# Altium PCB PCB1.PcbDoc
Units mil, origin at the board's own origin, x right, y up, seen from the top; angles counter-clockwise.
Board outline 3937.01 x 3937.01 mil, 2 copper layers (Top Layer, Bottom Layer); 40 components, 51 nets, 142 pads, 6 vias.
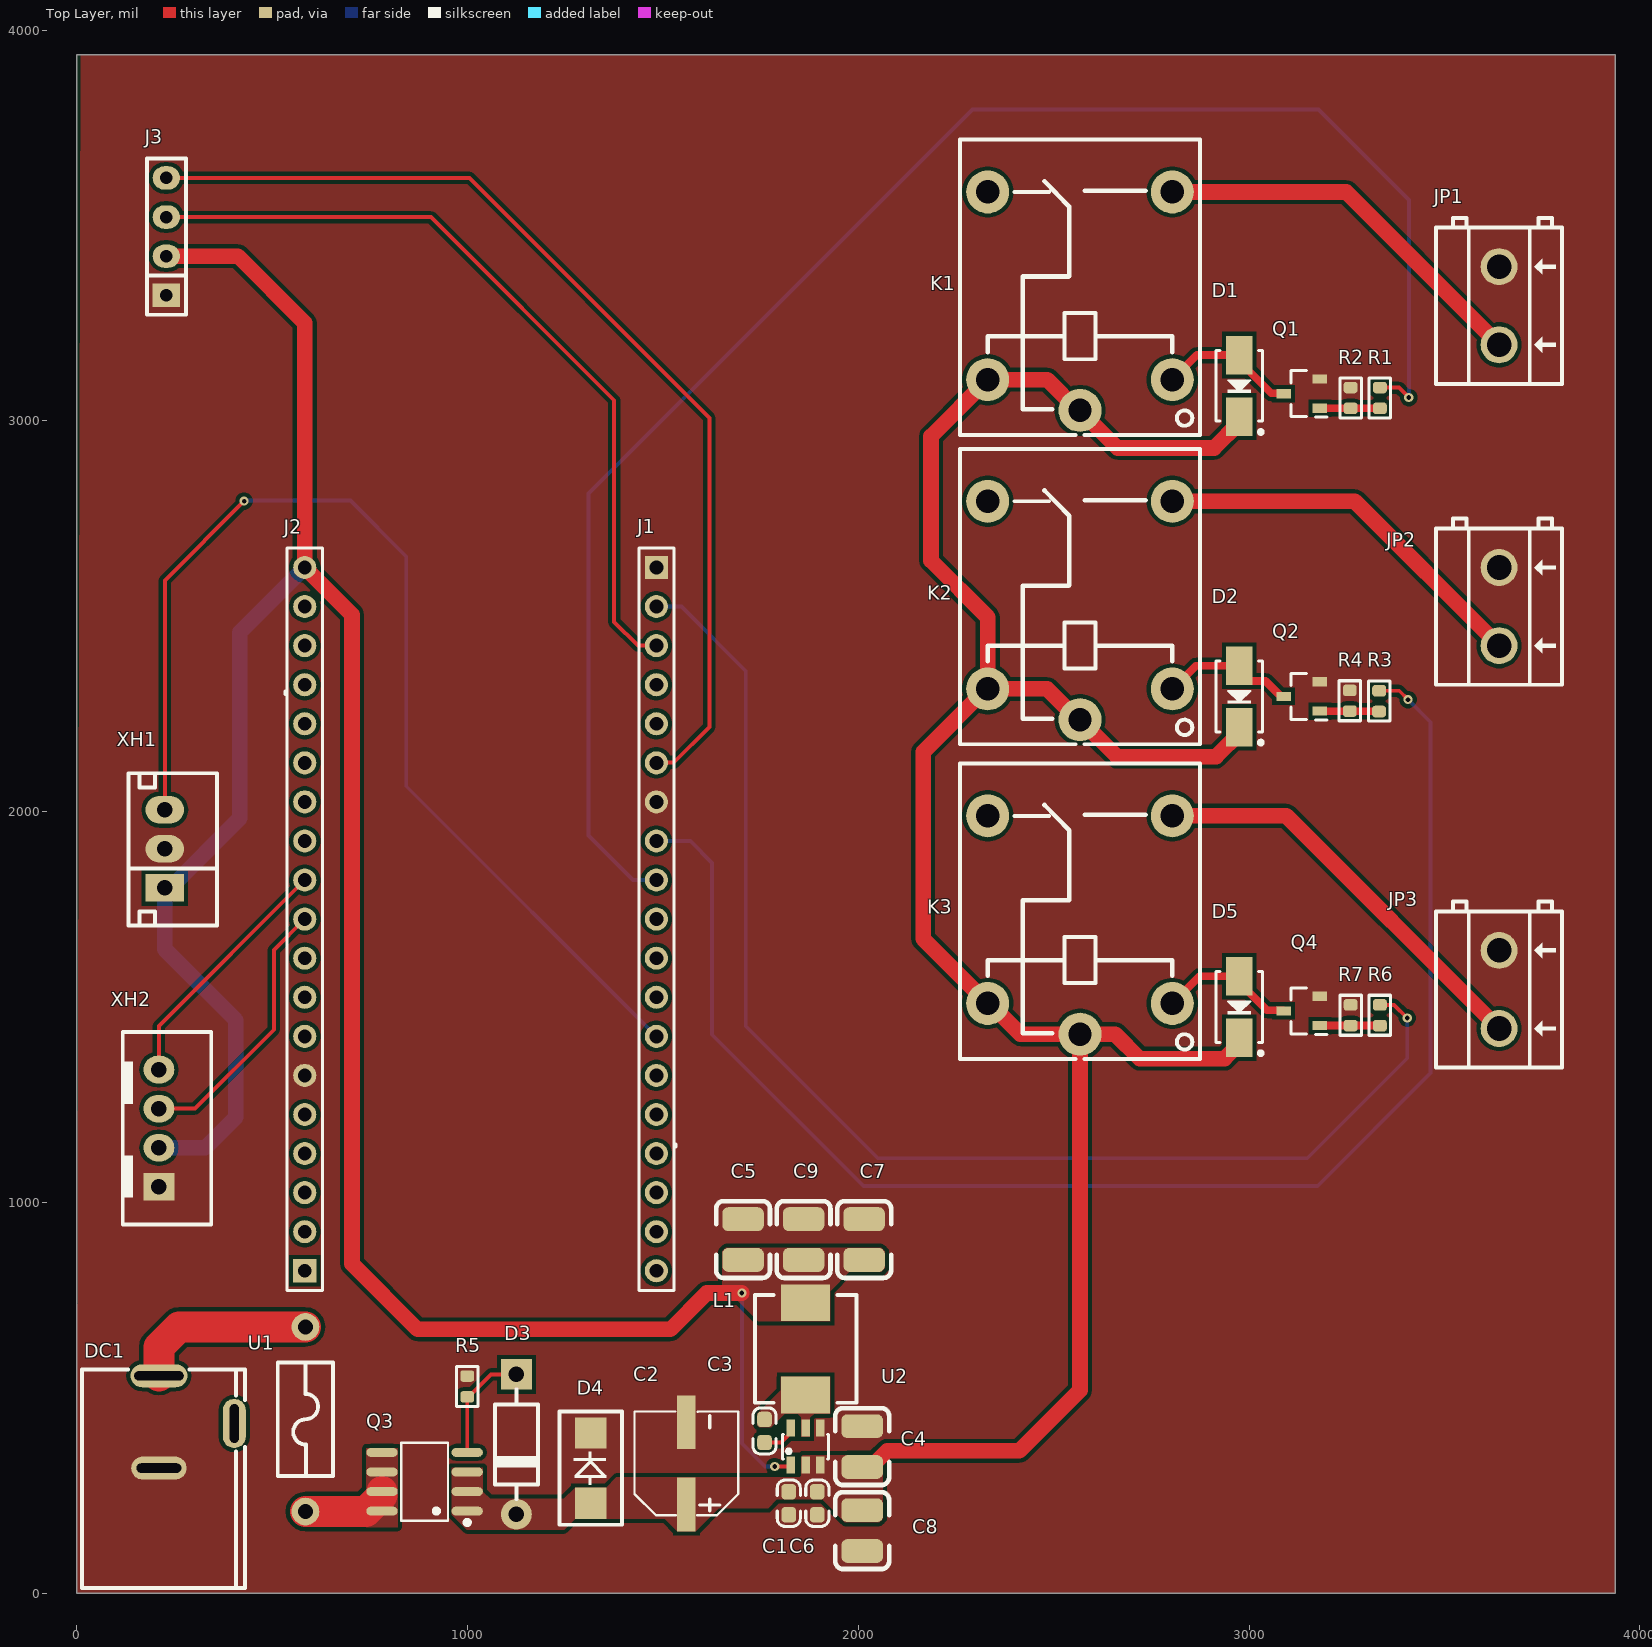
[diagram p0: Top Layer view]
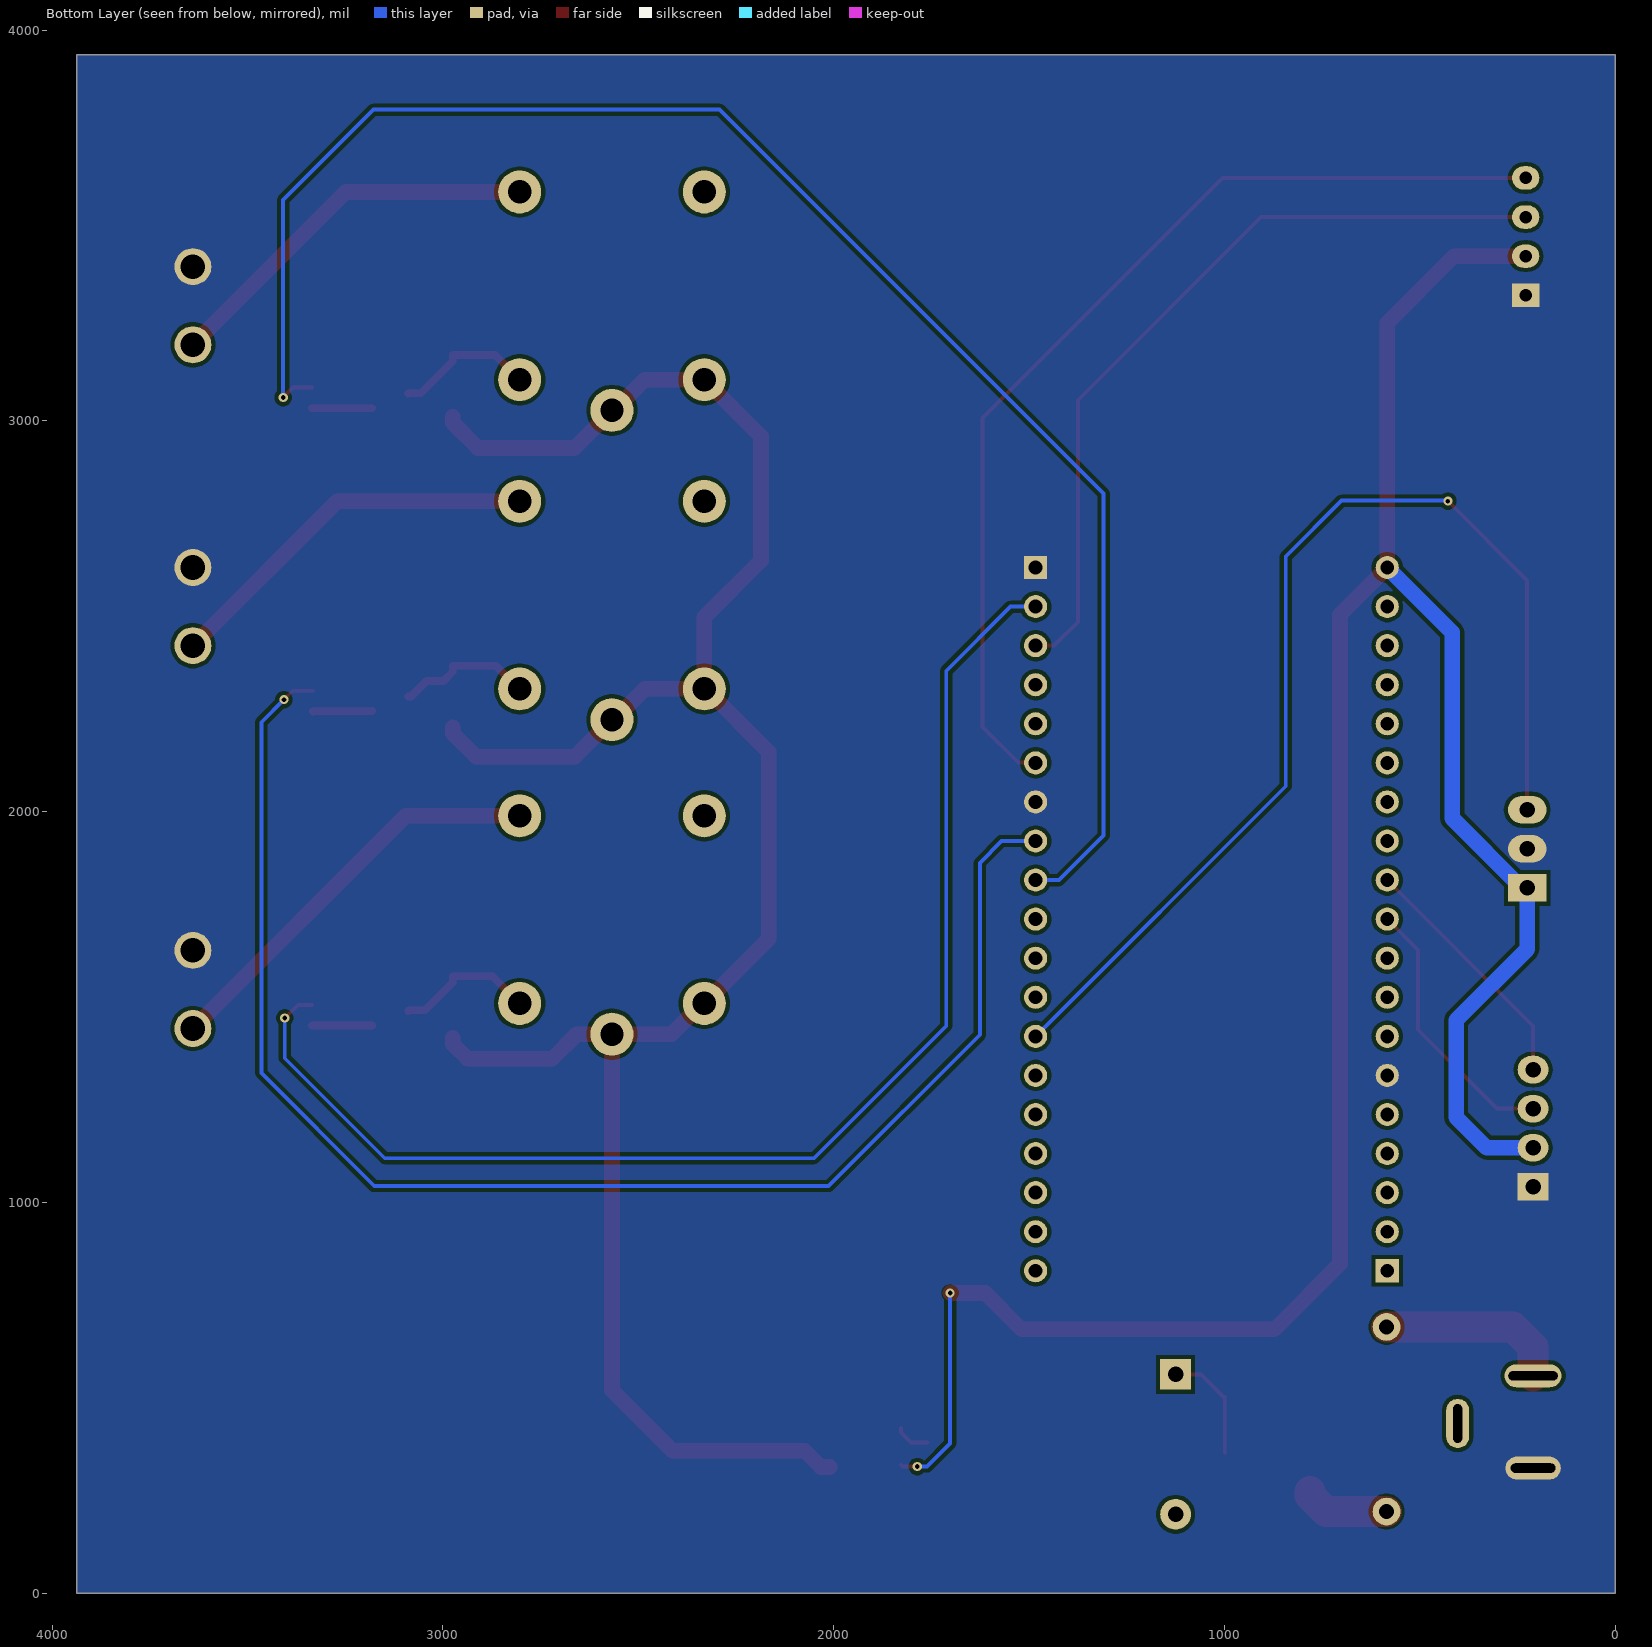
[diagram p1: Bottom Layer view, seen from below]
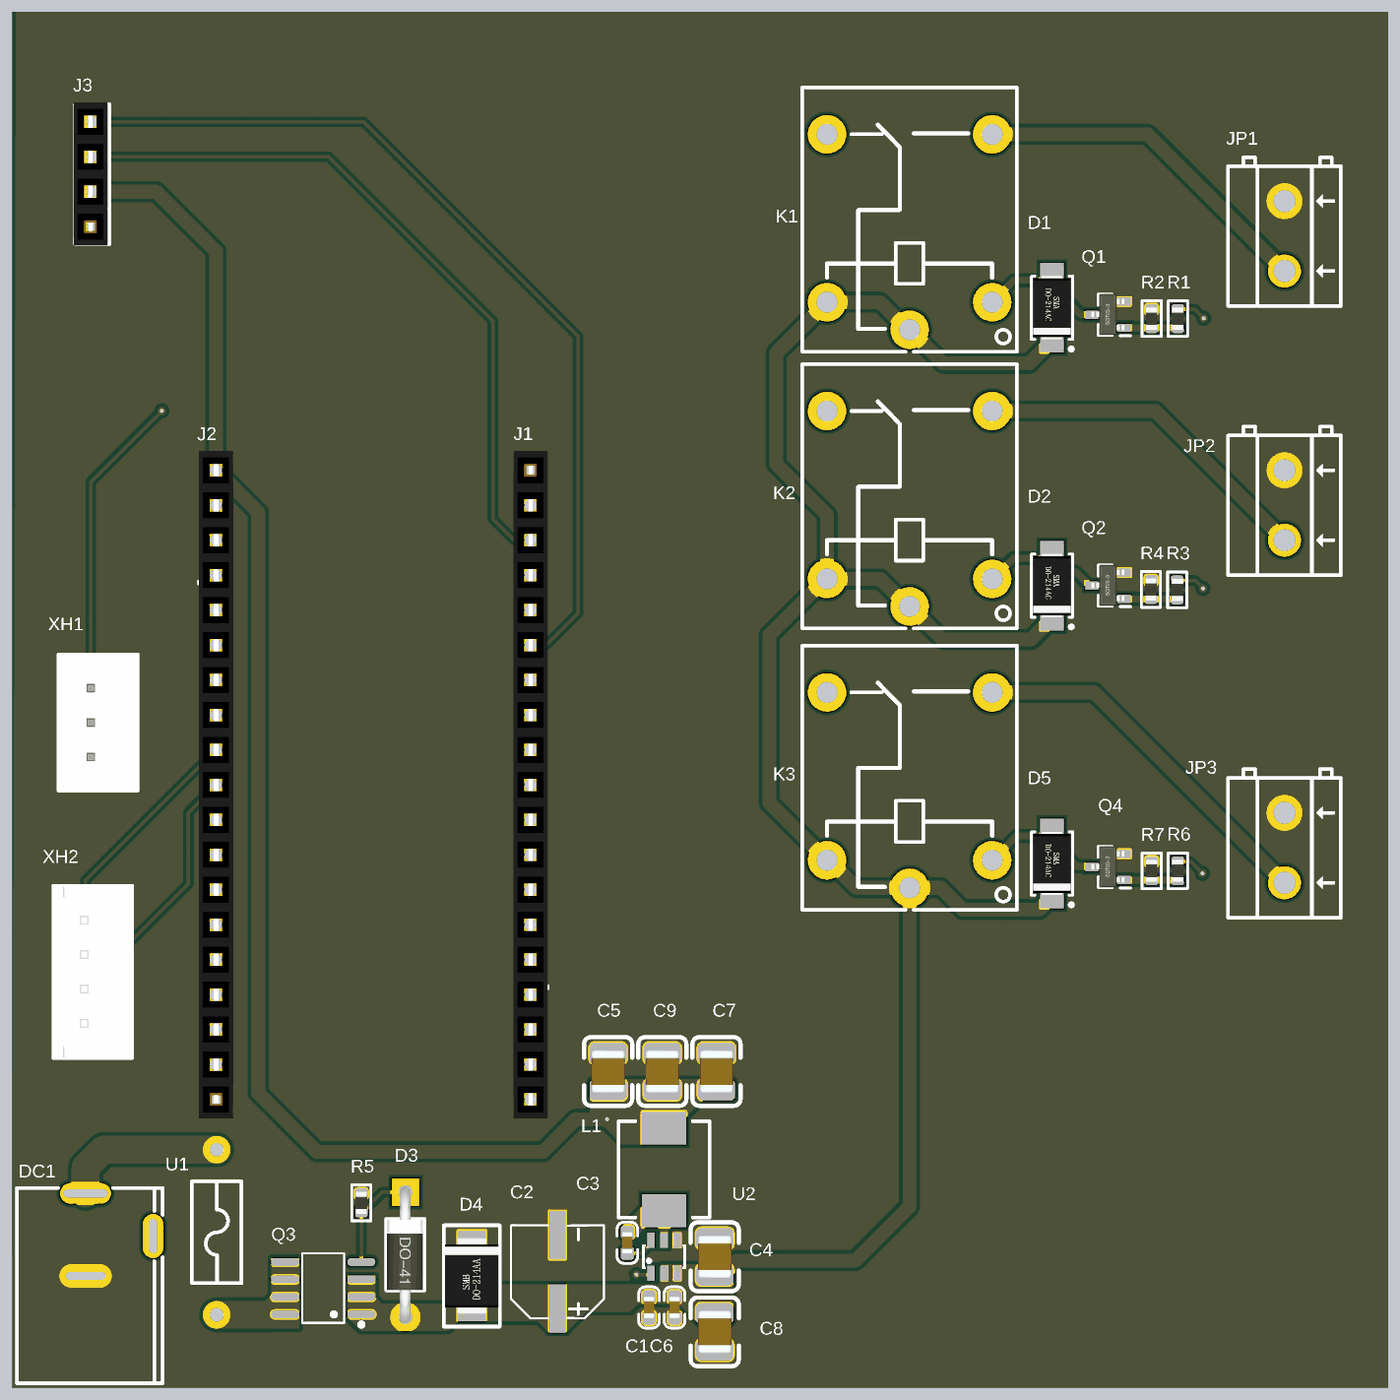
[diagram p2: 3D render of the assembled board from above, using the file's embedded part models]

## Layer stack, top to bottom
Top Solder: solder mask 0.4, Solder Resist, Dk 3.5
Top Layer: signal copper 1.4
Dielectric 1: dielectric 12.6, FR-4, Dk 4.8
Bottom Layer: signal copper 1.4
Bottom Solder: solder mask 0.4, Solder Resist, Dk 3.5

## Board outline
0,0 0,3937.01 3937.01,3937.01 3937.01,0

## Design rules (kind name [scope] priority, off if disabled: settings)
Clearance [All] p1: gap=10 ignorepadtopadclearanceinfootprint=FALSE except(0: Arc-Hole Track-Hole SMDPad-Hole THPad-Hole Via-Hole Fill-Hole Poly-Hole Region-Hole Text-Hole)
PolygonConnect [All] p1: connectstyle=Direct reliefconductorwidth=10 reliefentries=4 polygonreliefangle="90 Angle" airgapwidth=10
RoutingVias [All] p1: holewidth=11.81 width=23.62 viastyle="Through Hole" minholewidth=11.81 minwidth=23.62 maxholewidth=11.81 maxwidth=23.62
SolderMaskExpansion [All] p1: expansion=4 istentingtop=FALSE
Width [All] p1: maxlimit=80 minlimit=10 preferedwidth=10 minimp=50.000000 maximp=50.000000 favimp=50.000000
30 further rules are at their usual default settings.

## Components (designator, comment, footprint, x,y, rotation, side; value= is the part's Value field where it differs from the comment)
C1 "Cap" C_0603 1822,230 r270 top value=100nF
C2 "47uF" CAP-SMD_BD6.3-L6.6-W6.6-FD 1560,332 r90 top
C3 "Cap" C_0603 1760,415 r270 top value=100nF
C4 "Cap" C_1210 2010,375 r90 top value=10uF
C5 "Cap" C_1210 1705,905 r270 top value=22uF
C6 "Cap" C_0603 1895,230 r270 top value=100nF
C7 "Cap" C_1210 2015,905 r270 top value=22uF
C8 "Cap" C_1210 2010,160 r270 top value=10uF
C9 "Cap" C_1210 1860,905 r270 top value=22uF
D1 "S1M-E3/61T" SMA_DO214AC 2975,3090 r270 top
D2 "S1M-E3/61T" SMA_DO214AC 2975,2295 r270 top
D3 "1N4742A" DO-41 1125,560 r270 top
D4 "SMBJ15CA" SMB/DO-214AA 1315,320 r90 top
D5 "S1M-E3/61T" SMA_DO214AC 2975,1500 r270 top
DC1 "dc550200-1095-2h" DC-IN-TH_DC550200-1095-2H 306.46,438.11 r0 top
J1 "ESP_LEFT" Fe-HDR1X19/2.54-S 1483.19,2625 r0 top
J2 "ESP_RIGHT" Fe-HDR1X19/2.54-S 583.19,825 r180 top
J3 "OLED" Fe-HDR1X4/2.54-S 229,3322 r180 top
JP1 "VALVE 1" CONN-TH_P5.08_KF127-5.08-2P 3640,3295 r90 top
JP2 "VALVE 2" CONN-TH_P5.08_KF127-5.08-2P 3640,2525 r90 top
JP3 "LIGHT 1" CONN-TH_P5.08_KF127-5.08-2P 3640,1545 r90 top
K1 "srd-12vdc-sl-c" RELAY-TH_SRD-XXVDC-XL-C 2567.47,3306.63 r90 top
K2 "srd-12vdc-sl-c" RELAY-TH_SRD-XXVDC-XL-C 2567.47,2515 r90 top
K3 "srd-12vdc-sl-c" RELAY-TH_SRD-XXVDC-XL-C 2567.47,1710 r90 top
L1 "4.7uH" IND-SMD_L7.0-W6.6 1865,625 r90 top
Q1 "AO3400A" SOT23-3 3135,3070 r180 top
Q2 "AO3400A" SOT23-3 3135,2295 r180 top
Q3 "ao4407a_c2841482" SOP-8_L5.0-W4.0-P1.27-LS6.0-BL 890,285 r90 top
Q4 "AO3400A" SOT23-3 3135,1490 r180 top
R1 "Res2" R_0603 3335,3059 r90 top value=100Ω
R2 "Res2" R_0603 3260,3059 r90 top value=10K
R3 "Res2" R_0603 3333,2283 r90 top value=100Ω
R4 "Res2" R_0603 3258,2284 r90 top value=10K
R5 "Res2" R_0603 999,529 r90 top value=10K
R6 "Res2" R_0603 3335,1479 r90 top value=100Ω
R7 "Res2" R_0603 3260,1479 r90 top value=10K
U1 "0251003.nrt1l" FUSE-TH_BD3.0-L7.2-P11.20-D0.6 585,445 r270 top
U2 "ap63203wu-7" TSOT-26_L2.9-W1.6-P0.95-LS2.8-BL 1865,375 r0 top
XH1 "DS18B20" XH3/2.54mm/180 225,1905 r90 top
XH2 "SHT40" XH4/2.54mm/180 210,1190 r90 top

## Footprints (in the part's own frame and the unit in brackets; to place one, negate y for a bottom-side part, rotate by r counter-clockwise, add the part's x,y. Pads: shape width x height; smd on the part's side, far side on the other; paste and mask are expansions set on the pad)
C_0603 [mm] "Chip Capacitor, 2-Leads, Body 1.60x0.80mm, IPC Medium Density"
  rrect50% 1x0.95 smd: 1(-0.75,0) 2(0.75,0)
  silkscreen extent -1.5,-0.75 1.5,0.75, body extent -0.8,-0.4 0.8,0.4, height 0.87
C_1210 [mm] "Chip Capacitor, 2-Leads, Body 3.20x2.50mm, IPC Medium Density"
  rrect50% 1.55x2.7 smd: 1(-1.325,0) 2(1.325,0)
  silkscreen extent -2.5,-1.75 2.5,1.75, body extent -1.6,-1.25 1.6,1.25, height 2.7
CAP-SMD_BD6.3-L6.6-W6.6-FD [mm] "Lelon VZH470M1VTR-0606L C473421 47uF 35V SMD"
  rect 3.5x1.2 smd: 1(-2.67,0) 2(2.67,0)
  silkscreen extent -3.38,-3.38 3.38,3.38
CONN-TH_P5.08_KF127-5.08-2P [mm]
  round 2.4 hole 1.6: 1(-2.54,0) 2(2.54,0)
  silkscreen extent -5.08,-4.1 5.71,4.1
DC-IN-TH_DC550200-1095-2H [mm]
  oval 3.7x1.5 hole 0.6 slot 3.2 at 0 deg: 1(-2.45,3)
  oval 3.6x1.5 hole 0.6 slot 2.9 at 0 deg: 2(-2.45,-3)
  oval 1.5x3.2 hole 0.6 slot 2.5 at 90 deg: 3(2.45,-0.1)
  silkscreen extent -7.45,-10.8 3.15,3.4
DO-41 [mm]
  rect 2x2 hole 1: A(0,0)
  round 2 hole 1: K(9.1,0)
  silkscreen extent 0.99,-1.4 8.11,1.4, body extent -0.38,-1.33 9.52,1.27, height 2.65
Fe-HDR1X4/2.54-S [mil]
  rect 70x60 hole 32: 1(0,0)
  oval 70x60 hole 32: 2(0,-100) 3(0,-200) 4(0,-300)
  silkscreen extent -50,-350 50,50, body extent -44,-355 54,55, height 335
Fe-HDR1X19/2.54-S [mm]
  rect 1.5x1.5 hole 0.9: 1(0,0)
  round 1.5 hole 0.9: 2(0,-2.54) 3(0,-5.08) 4(0,-7.62) 5(0,-10.16) 6(0,-12.7) 7(0,-15.24) 8(0,-17.78) 9(0,-20.32) 10(0,-22.86) 11(0,-25.4) 12(0,-27.94) 13(0,-30.48) 14(0,-33.02) 15(0,-35.56) 16(0,-38.1) 17(0,-40.64) 18(0,-43.18) 19(0,-45.72)
  silkscreen extent -1.14,-46.99 1.27,1.27, body extent -1.25,-47.11 1.25,1.4, height 3.2
FUSE-TH_BD3.0-L7.2-P11.20-D0.6 [mm]
  round 1.8 hole 1: 1(-6,0) 2(6,0)
  silkscreen extent -3.7,-1.8 3.7,1.8
IND-SMD_L7.0-W6.6 [mm]
  rect 2.4x3.2 smd: 1(-3,0) 2(3,0)
  silkscreen extent -3.5,-3.3 3.5,3.3
R_0603 [mm] "Chip Resistor, 2-Leads, Body 1.60x0.80mm, IPC Medium Density"
  rrect50% 0.75x0.9 smd: 1(-0.675,0) 2(0.675,0)
  silkscreen extent -1.3,-0.7 1.3,0.7, body extent -0.8,-0.42 0.8,0.43, height 0.6
RELAY-TH_SRD-XXVDC-XL-C [mil]
  round 110 hole 60: 1(-200.79,-236.22) 2(279.53,-236.2) 3(279.53,236.2) 4(-200.79,236.22) 5(-279.53,0)
  silkscreen extent -342,-307 413,307
SMA_DO214AC [mm] "Molded Diode, 2-Leads, Body 4.30x2.61mm, IPC Medium Density"
  rect 2.5x1.7 smd: A(-2,0) K(2,0)
  silkscreen extent -2.3,-1.5 3.12,1.53, body extent -2.3,-1.35 2.3,1.35, height 2.4
SMB/DO-214AA [mil] "塑封二极管"
  rect 80x80 smd: A(-90,0) K(90,0)
  silkscreen extent -145,-80 145,80, body extent -110,-77 110,77, height 98
SOP-8_L5.0-W4.0-P1.27-LS6.0-BL [mil]
  oval 22.6x80.14 smd: 1(-75,-108.97) 2(-25,-108.97) 3(25,-108.97) 4(75,-108.97) 5(75,108.97) 6(25,108.97) 7(-25,108.97) 8(-75,108.97)
  silkscreen extent -110,-115 99,60
SOT23-3 [mm] "SOT23, 3-Leads, Body 2.90x2.40mm, Pitch 0.95mm, IPC Medium Density"
  rect 0.95x0.6 smd: D(1.175,0) G(-1.175,0.95) S(-1.175,-0.95)
  silkscreen extent -1.65,-1.5 0.7,1.52, body extent -1.2,-1.52 1.2,1.48, height 1.05
TSOT-26_L2.9-W1.6-P0.95-LS2.8-BL [mm]
  rect 0.55x1.1 smd paste+0 mask+0.05: 1(-0.95,-1.2) 2(0,-1.2) 3(0.95,-1.2) 4(0.95,1.2) 5(0,1.2) 6(-0.95,1.2)
  silkscreen extent -1.5,-0.8 1.5,0.8
XH3/2.54mm/180 [mm]
  rect 1.8x2.5 hole 1: 1(-2.54,0)
  oval 1.8x2.5 hole 1: 2(0,0) 3(2.54,0)
  silkscreen extent -4.99,-3.4 4.91,2.35, body extent -4.99,-3.4 4.91,2.35, height 7
XH4/2.54mm/180 [mm]
  rect 1.8x2 hole 1: 1(-3.81,0)
  oval 1.8x2 hole 1: 2(-1.27,0) 3(1.27,0) 4(3.81,0)
  silkscreen extent -6.26,-3.4 6.26,2.35, body extent -6.2,-3.3 6.2,2.45, height 7

## Part data
C1 C3 C4 C5 C6 C7 C8 C9: "Capacitor", LatestRevisionDate=17-Jul-2002, LatestRevisionNote="Re-released for DXP Platform.", PackageDescription="Radial Cap, Thru-Hole; 2 Leads; 0.3 in Pin Spacing", PackageReference=RAD-0.3, Published=8-Jun-2000, Publisher="Altium Limited"
C2: library part Cap_E_SMD, "贴片电解电容"
D1 D2 D5: library part Diode_Genneral, "普通二极管"
D3: library part Diode_Zener, "稳压二极管"
D4: library part Diode_TVS, "双向瞬态抑制二极管"
DC1: "连接器类型:DC电源插座;安装方式:弯插;触点外径:6.4mm;额定电流:5A;额定电压:60V;", Current Rating=5A, JLCPCB Part Class="Extended Part", LCSC Part Name="DC电源插座 外径:6.4mm", Manufacturer=HDGC(华德共创), ManufacturerPart=DC550200-1095-2H, Voltage Rating (Max)=60V, AddInBom=yes, Body Height=11.5mm, Connector Type=DC电源插座, ConvertToPcb=yes, Datasheet=https://item.szlcsc.com/datasheet/DC550200-1095-2H/8703781.html, FootprintName=DC-IN-TH_DC550200-1095-2H, Length=14.2mm, ModelId=56d1b1affb614907a521073155fd6544, ModelName=DC-IN-TH_DC550200-1095-2H, ModelTransform=417.322,559.054,0,0,0,0,-84.643,-145.667,-118.11, Mounting Type=弯插, Outside Contact Diameter=6.4mm, Supplier=LCSC, Supplier Footprint=插件, SupplierPart=C7587689, Symbol=DC550200-1095-2H, Width=10.6mm
J1 J2: library part FemaleHDR_1X19
J3: library part FemaleHDR_1X4
JP1 JP2 JP3: library part "Header 2", "Header, 2-Pin", Publisher="Altium Limited", Revision="17-Jul-2002: Re-released for DXP Platform."
K1 K2 K3: "线圈电压:12V;触点形式:一组转换:1C(单刀双掷-转换);触点容量(电阻负载):-;最大切换电压:250V@AC;最大切换电流:15A;", Coil Rated Power=360mW, Coil Resistance=400Ω, Coil Voltage=12V, Contact Rating=-, Contact Resistance=100mΩ, JLCPCB Part Class="Extended Part", LCSC Part Name=单组转换型继电器, Manufacturer=松乐, ManufacturerPart=SRD-12VDC-SL-C, Switching Current(Max)=15A, Switching Voltage(Max)=250V@AC, AddInBom=yes, Coil Type=无极性-单线圈, Contact Form=一组转换:1C(单刀双掷-转换), ConvertToPcb=yes, Datasheet=https://item.szlcsc.com/datasheet/SRD-12VDC-SL-C/31188.html, FootprintName=RELAY-TH_SRD-XXVDC-XL-C, Height=15.8mm, Length=19.2mm, ModelId=d0eda9b8bf8746d18ae810ab88dc78e7, ModelName=RELAY-TH_L19.2-W15.6-H15.8, ModelTransform=755.904,622.4397,0,0,0,0,34.882,0,-118.11, Number of Pins=5, Operate Time=10ms, Release Time=10ms, Supplier=LCSC, Supplier Footprint=插件,19.2x15.6mm, SupplierPart=C30431, Symbol=SRD-12VDC-SL-C, Width=15.6mm
L1: library part Ind_Molded, "一体成型功率电感"
Q1 Q2 Q4: library part MOSFET_N, "N沟道场效应管"
Q3: "数量:1个P沟道;漏源电压(Vdss):30V;连续漏极电流(Id):14A;导通电阻(RDS(on)):9.5mΩ@10V；14.7mΩ@4.5V;耗散功率(Pd):3.1W;阈值电压(Vgs(th)):1.8V;", Current - Continuous Drain(Id)=14A, Drain to Source Voltage=30V, Gate Threshold Voltage (Vgs(th))=1.8V, Input Capacitance(Ciss)=2.05nF, JLCPCB Part Class="Extended Part", LCSC Part Name="1个P沟道 耐压:30V 电流:14A", Manufacturer=UMW(友台半导体), ManufacturerPart=AO4407A, Operating Temperature=-55℃~+150℃, Output Capacitance(Coss)=330pF, Pd - Power Dissipation=3.1W, Reverse Transfer Capacitance (Crss@Vds)=300pF, AddInBom=yes, ConvertToPcb=yes, Datasheet=https://item.szlcsc.com/datasheet/AO4407A/3024118.html, FootprintName=SOP-8_L5.0-W4.0-P1.27-LS6.0-BL, Gate Charge(Qg)=40nC@10V；20nC@4.5V, ModelId=a3315c1c78f949e6bb82c6eaca1c53c7, ModelName=SOP-8_L5.0-W4.0-H1.8-LS6.2-P1.27, ModelTransform=244.094,196.85,0,90,0,0,0,0,0, Number=1个P沟道, RDS(on)=9.5mΩ@10V；14.7mΩ@4.5V, Supplier=LCSC, Supplier Footprint=SOP-8, SupplierPart=C2841482, Symbol=AO4407A_C2841482
R1 R2 R3 R4 R5 R6 R7: "Resistor", LatestRevisionDate=17-Jul-2002, LatestRevisionNote="Re-released for DXP Platform.", PackageDescription="Axial Device, Thru-Hole; 2 Leads; 0.4 in Pin Spacing", PackageReference=AXIAL-0.4, Published=8-Jun-2000, Publisher="Altium Limited"
U1: "类型:电阻式保险丝;额定电流:3A;额定电压:125V;分断能力:50A；300A;", Current Rating=3A, Interrupt Rating=50A；300A, JLCPCB Part Class="Extended Part", LCSC Part Name=插件式保险丝, Manufacturer=Littelfuse(美国力特), ManufacturerPart=0251003.NRT1L, Operating Temperature=-55℃~+125℃, Voltage Rating (DC)=125V, AddInBom=yes, ConvertToPcb=yes, Datasheet=https://item.szlcsc.com/datasheet/0251003.NRT1L/190321.html, Diameter (φD)=2.8mm, FootprintName=FUSE-TH_BD3.0-L7.2-P11.20-D0.6, Length=7.1mm, Melting I2t=1.19, ModelId=8493180d87ef424b8637a2753ca991c6, ModelName=FUSE-TH_BD3.4-L7.1-P11.20-D0.6, ModelTransform=497.6368,134.6891,0,0,0,0,0,0,-196.85, Supplier=LCSC, Supplier Footprint=插件,D2.8xL7.1mm, SupplierPart=C178928, Symbol=0251003.NRT1L, Type=电阻式保险丝
U2: "功能类型:降压型;工作电压:3.8V~32V;输出电压:3.3V;输出电流:2A;输出类型:固定;", Frequency - Switching=1.1MHz, JLCPCB Part Class="Extended Part", LCSC Part Name="降压型 2A 3.8V~32V", Manufacturer=DIODES(美台), ManufacturerPart=AP63203WU-7, Operating Temperature=-40℃~+85℃@(TA), Output Current=2A, Output Voltage=3.3V, Quiescent Current=22uA, Voltage - Supply=3.8V~32V, AddInBom=yes, ConvertToPcb=yes, Datasheet=https://item.szlcsc.com/datasheet/AP63203WU-7/832852.html, Features=轻载高效模式；逐波限流；过流保护；EMI优化(抖频模式)；打嗝限流, FootprintName=TSOT-26_L2.9-W1.6-P0.95-LS2.8-BL, Function=降压型, ModelId=72111e290d4d478b9e0e0b94fc1a26b1, ModelName=TSOT-26_L2.9-W1.6-P0.95-LS2.8-BL, ModelTransform=114.173,110.236,0,0,0,0,0,0,0, Number of Outputs=1, Output Type=固定, Supplier=LCSC, Supplier Footprint=TSOT-23-6, SupplierPart=C780769, Switch tube (built-in/external)=内置, Symbol=AP63203WU-7, Synchronous Rectifier=是, Topology=降压式
XH1: library part XH3
XH2: library part XH4

## Via types
v1: diameter 23.62, hole 11.81, Top Layer to Bottom Layer, tented both sides, 6 vias

## Nets (pads, with @x,y where several pads share a name; then routed paths per layer and width w, separated by ;. In a path a pad name is that pad's centre, name@x,y a point inside that pad or via, vN(x,y) a via of type N, cw(c..) or ccw(c..) an arc to the next point about the centre after c; other vN are vias at no path point)
3V3: C5.2 C7.2 C9.2 J2.19 J3.2 L1.2 U2.1 XH1.1 XH2.2 | length 6393.8
  Top Layer w10: v1(1786,324) 1823.84,324 U2.1
  Top Layer w40: J3.2 412,3422 583.19,3250.81 J2.19 704,2504.19 704,843 872,675 1519,675 1612,768 v1(1702,768)
  Bottom Layer w10: v1(1702,768) 1702,383 1761,324 v1(1786,324)
  Bottom Layer w40: XH2.2 329,1140 407,1218 407,1466 225,1648 XH1.1 238.78,1805 416.88,1983.1 416.88,2458.69 J2.19
5V: J2.1
+12V_BUS: C1.1 C2.1 C4.1 C6.1 C8.1 D1.K D2.K D3.K D4.A D5.K K1.4 K1.5 K2.4 K2.5 K3.4 K3.5 Q3.1 Q3.2 Q3.3 U2.2 U2.3 | length 5654.2
  Top Layer w40: C4.1 2032.64,322.83 2073.8,364 2412,364 2567.47,519.47 K3.5 ; D5.K 2975,1405.51 2937.49,1368 2720,1368 2657.53,1430.47 K3.5 ; D2.K 2975,2200.51 2915.49,2141 2661.94,2141 K2.5 2562.31,2235.47 2483.57,2314.21 K2.4 ; D1.K 2975,2995.51 2910.49,2931 2663.56,2931 K1.5 2562.31,3027.1 2483.57,3105.84 K1.4 2186,2960.59 2186,2643 2331.25,2497.75 K2.4 ; K2.4 2327.21,2314.21 2166,2153 2166,1674.46 K3.4 2336.4,1509.21 2415.14,1430.47 K3.5
+12V_FUSED: Q3.5 Q3.6 Q3.7 Q3.8 U1.2 | length 223.1
  Top Layer w80: U1.2 739.74,208.78 781.03,250.07 Q3.7
+12V_IN: DC1.1 U1.1 | length 470
  Top Layer w80: DC1.1 210,630 261.22,681.22 U1.1
CLK: J1.19
CMD: J2.2
EN: J2.18
GND: C1.2 C2.2 C4.2 C5.1 C6.2 C7.1 C8.2 C9.1 D4.K DC1.2 J1.1 J1.7 J2.6 J3.1 JP1.2 JP2.2 JP3.2 Q1.S Q2.S Q4.S R2.2 R4.2 R5.2 R7.2 U2.4 XH1.2 XH2.1
NetC3_1: C3.1 L1.1 U2.5
NetC3_2: C3.2 U2.6 | length 89.2
  Top Layer w10: C3.2 1801.66,385.47 1827.6,411.41 U2.6
NetD1_A: D1.A K1.1 Q1.D | length 361.2
  Top Layer w20: K1.1 2866.59,3168.74 D1.A 2975,3152.99 3056.9,3071.1 3087.65,3071.1 Q1.D
NetD2_A: D2.A K2.1 Q2.D | length 351.6
  Top Layer w20: K2.1 2804.84,2314.21 2864.36,2373.74 D2.A 2975,2357.99 2998.46,2334.53 3042.32,2334.53 3081.85,2295 Q2.D
NetD3_A: D3.A Q3.4 R5.1 | length 301.6
  Top Layer w10: Q3.4 R5.1 1001.95,502.43 1059.53,560 D3.A D3.A@1118.43,566.57
NetD5_A: D5.A K3.1 Q4.D | length 359.8
  Top Layer w20: K3.1 2873.22,1578.74 D5.A 2975,1562.99 3046.18,1491.81 3086.93,1491.81 Q4.D
NetJP1_1: JP1.1 K1.2 | length 998.4
  Top Layer w40: K1.2 3248.84,3586.16 JP1.1
NetJP2_1: JP2.1 K2.2 | length 989.4
  Top Layer w40: K2.2 3270.47,2794.53 JP2.1
NetJP3_1: JP3.1 K3.2 | length 1061.9
  Top Layer w40: K3.2 3095.47,1989.53 JP3.1
NetQ1_G: Q1.G R1.1 R2.1 | length 153.8
  Top Layer w20: Q1.G 3181.35,3032.51 3334.91,3032.51 R1.1
NetQ2_G: Q2.G R3.1 R4.1 | length 152.2
  Top Layer w20: Q2.G 3181.85,2257.01 3332.41,2257.01 R3.1
NetQ4_G: Q4.G R6.1 R7.1 | length 153.8
  Top Layer w20: Q4.G 3181.35,1452.51 3334.91,1452.51 R6.1
P0: J1.14
P2: J1.15
P4: J1.13 XH1.3 | length 2841.9
  Top Layer w10: XH1.3 225,2592 v1(428,2795)
  Bottom Layer w10: v1(428,2795) 429,2796 700,2796 843,2653 843,2065.19 J1.13
P5: J1.10
P12: J2.7
P13: J2.5
P14: J2.8
P15: J1.16
P16: J1.12
P17: J1.11
P18: J1.9 R1.2 | length 4289.9
  Top Layer w10: R1.2 3383.43,3085.57 v1(3409,3060)
  Bottom Layer w10: J1.9 1423,1825 1309,1939 1309,2814 2292,3797 3178,3797 3409,3566 v1(3409,3060)
P19: J1.8 R3.2 | length 3788.4
  Top Layer w10: R3.2 3384.43,2309.57 v1(3407,2287)
  Bottom Layer w10: J1.8 1570,1925 1626,1869 1626,1429 2013,1042 3176,1042 3465,1331 3465,2229 v1(3407,2287)
P21_OLED_SDA: J1.6 J3.4 | length 2609.2
  Top Layer w10: J3.4 1005,3622 1619,3008 1619,2217 1527.72,2125.72 1483.91,2125.72 J1.6
P22_OLED_SCL: J1.3 J3.3 | length 2040.7
  Top Layer w10: J3.3 906,3522 1375,3053 1375,2486 1436,2425 J1.3
P23: J1.2 R6.2 | length 3332.1
  Top Layer w10: R6.2 3371.43,1505.57 v1(3405,1472)
  Bottom Layer w10: J1.2 1547,2525 1712,2360 1712,1451 2050,1113 3149,1113 3405,1369 v1(3405,1472)
P25_SHT_SDA: J2.11 XH2.4 | length 639.6
  Top Layer w10: XH2.4 210,1451.81 J2.11
P26_SHT_SCL: J2.10 XH2.3 | length 693.5
  Top Layer w10: XH2.3 302,1240 504,1442 504,1645.81 J2.10
P27: J2.9
P32: J2.13
P33: J2.12
P34: J2.15
P35: J2.14
RX: J1.5
SD0: J1.18
SD1: J1.17
SD2: J2.4
SD3: J2.3
SVN: J2.16
SVP: J2.17
TX: J1.4
pads on no net: DC1.3 K1.3 K2.3 K3.3

## Polygon pours and split planes (outlines as drawn)
GND on Top Layer "NONET_L-01_P-001" (solid, pour order 4): 10.39,3937.01 3937.01,3937.01 3937.01,0 0,0
+12V_BUS on Top Layer "NONET_L-01_P-001" (solid, pour order 1): 958.9,321.3 1039.04,321.3 1039.04,260 1057.94,241.1 1246.1,241.1 1275,270 1355,270 1381,296 1850,296 1854.17,300.17 1854.17,349.41 1858.11,353.35 2054.21,353.35 2063.15,344.41 2063.15,190.59 2054.21,181.65 1965.79,181.65 1907.6,239.84 1791.84,239.84 1769,217 1642.64,217 1583.62,157.98 1536.38,157.98 1504.36,190 1275,190 1247.36,162.36 997.64,162.36 958.9,201.1
3V3 on Top Layer "NONET_L-01_P-001" (solid, pour order 3): 1660.79,883.35 1651.85,874.41 1651.85,788.15 1744.13,695.87 1927.99,695.87 1927.99,773.21 1977.11,822.32 2059.21,822.32 2068.15,831.26 2068.15,874.41 2059.21,883.35 1868.04,883.35
NetC3_1 on Top Layer "NONET_L-01_P-001" (solid, pour order 2): 1777.02,424.84 1811.82,459.65 1845.07,459.65 1854.17,450.55 1854.17,400.59 1875.83,400.59 1875.83,448.83 1886.65,459.65 1927.99,459.65 1927.99,554.14 1802.01,554.14 1802.01,519.44 1741.3,458.74 1741.3,430.32 1746.78,424.84
+12V_FUSED on Top Layer "Q3_in" (solid, pour order 0): 740.96,371.3 821.1,371.3 821.1,169 740.96,169
GND on Bottom Layer "NONET_L-01_P-001" (solid, pour order 5): 0,3937.01 3937.01,3937.01 3937.01,0 0,0

## Silkscreen, mask and mechanical layers (free items; w line width, h text height)
Mechanical 1:
  the board outline again, w10

## Text inside footprints (layer, text, board x,y; h text height)
XH1: Top Assembly "1" at 262.92,1792.65 h118.11 r90
XH2: Top Assembly "1" at 247.92,1028.44 h118.11 r90